# Altium PCB Baseboard-v2.0.PcbDoc (part 4 of 7)
Units mil, origin at the board's own origin, x right, y up, seen from the top; angles counter-clockwise.
Board outline 4488.19 x 3937 mil, 4 copper layers (Top Layer, Ground, Power + Signal, Bottom Layer), stack 61.81 mil thick; 219 components, 194 nets, 891 pads, 449 vias.
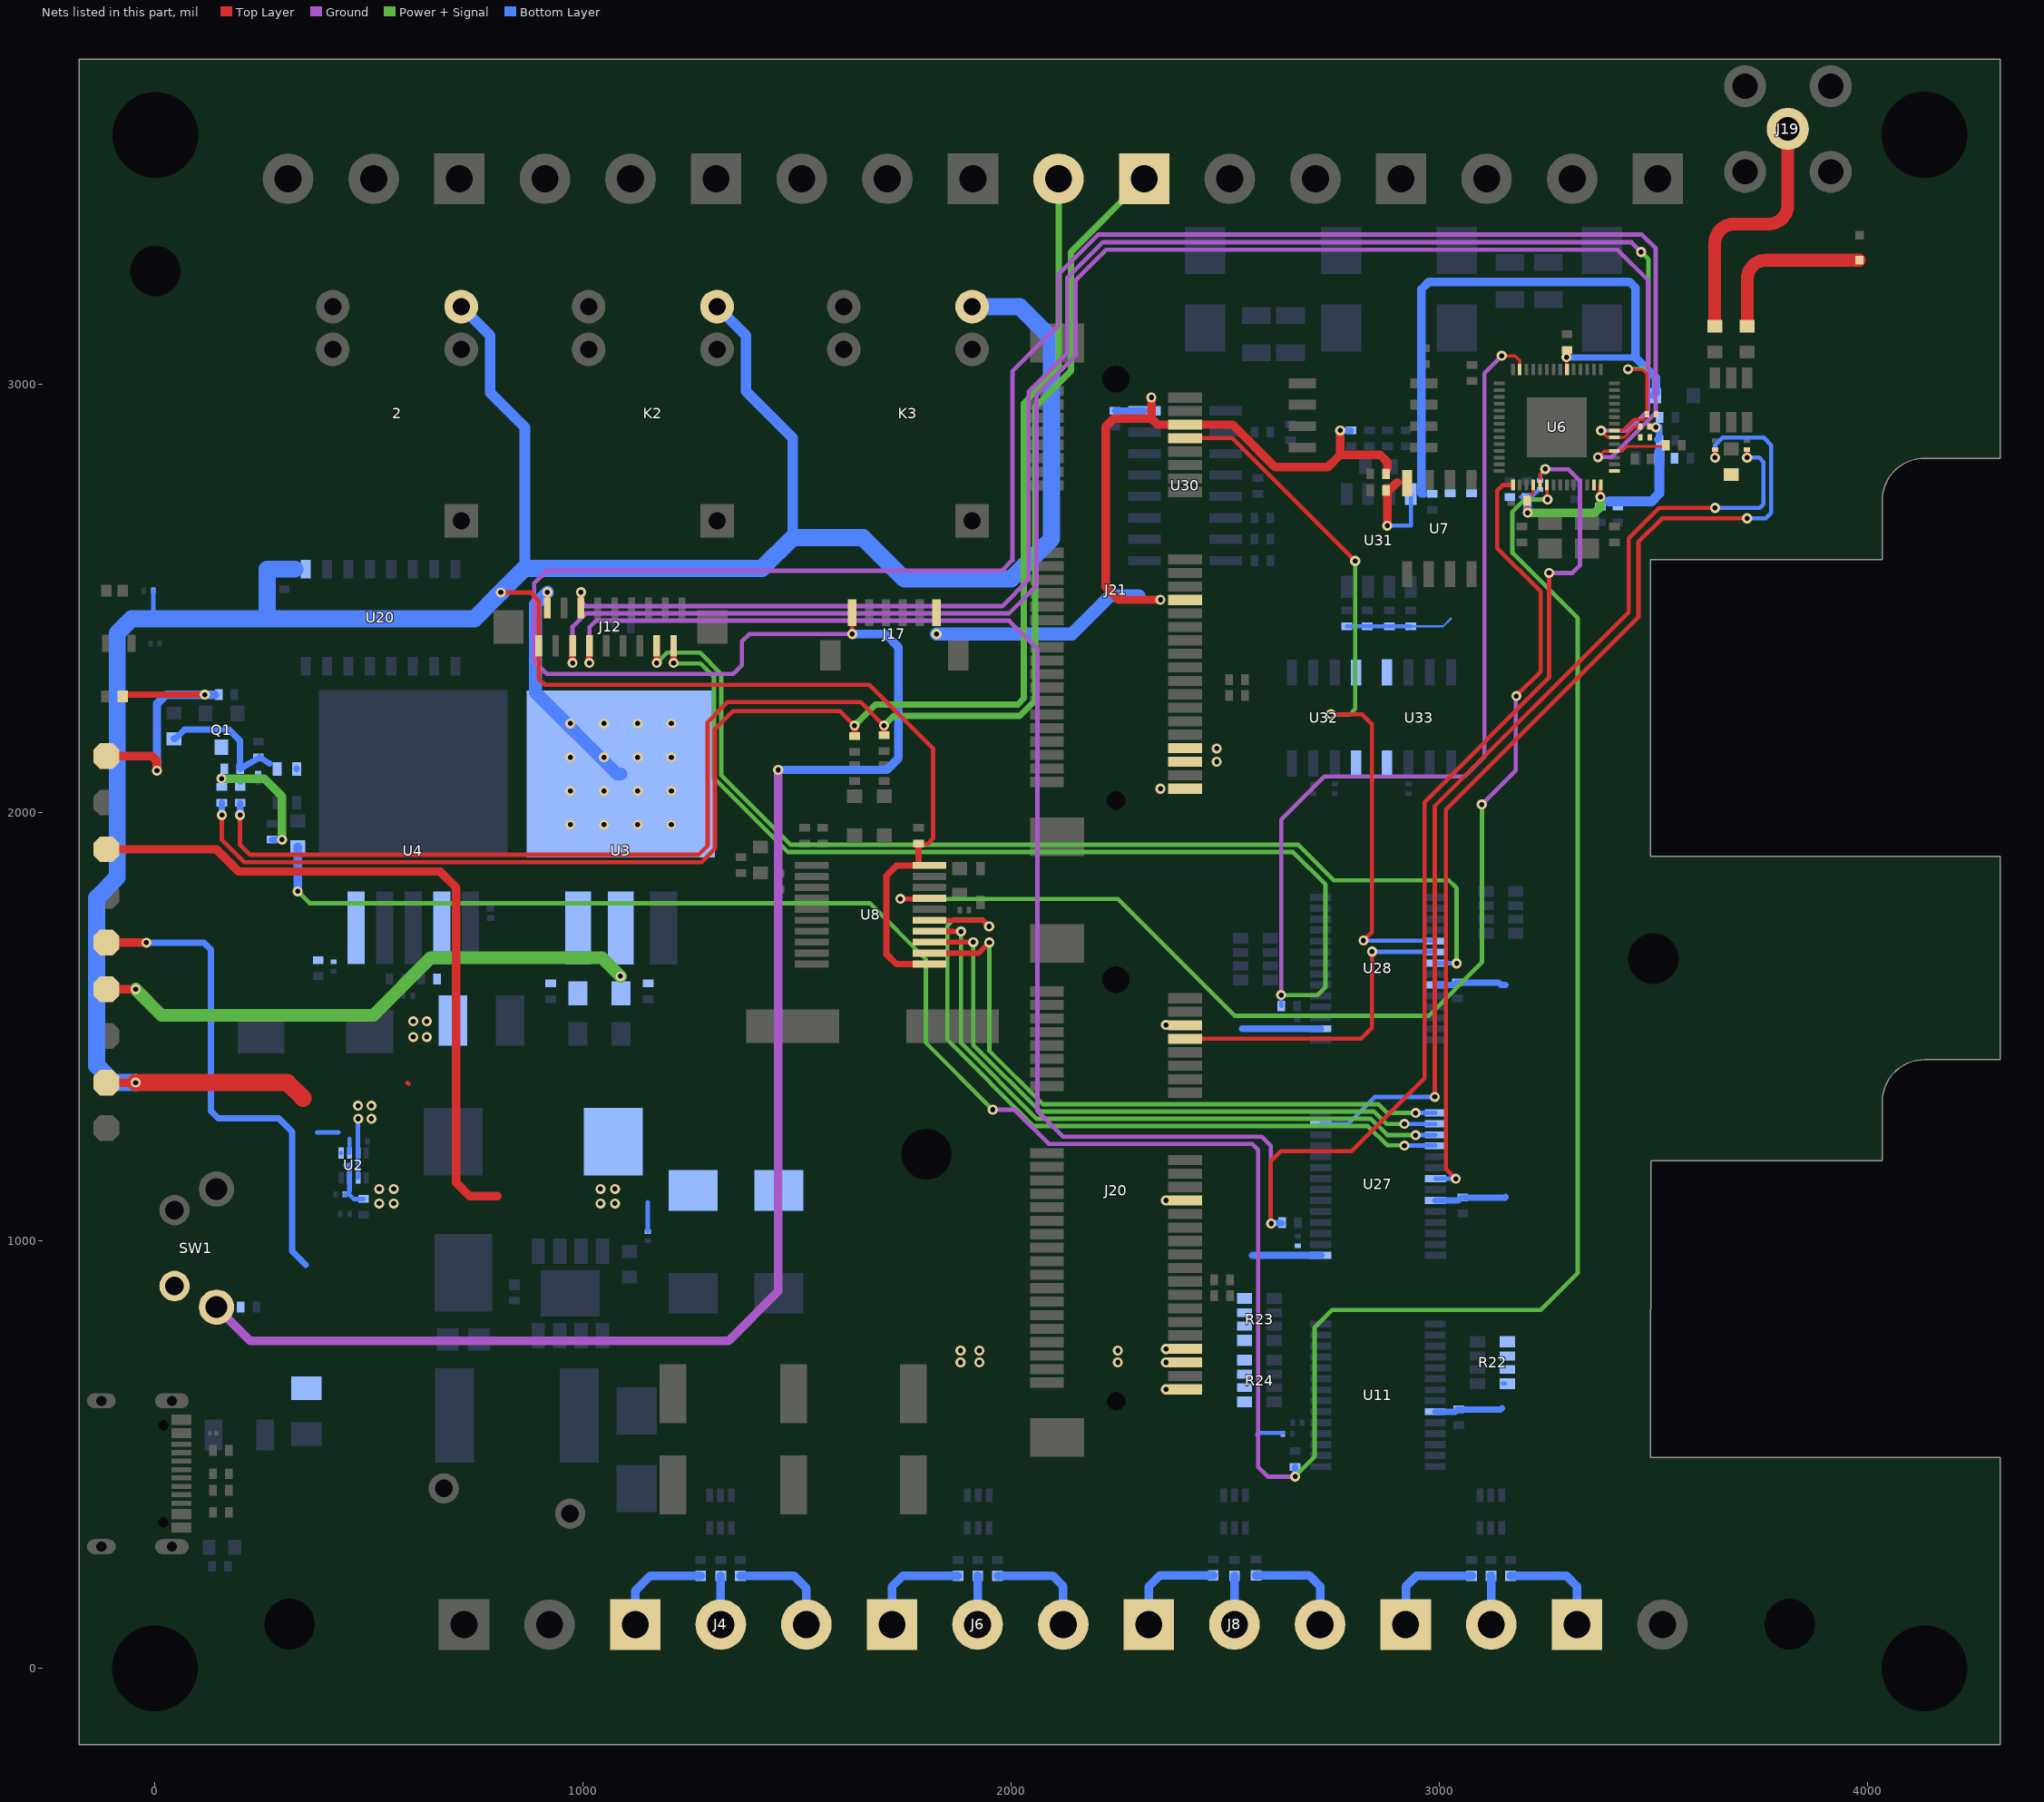
[diagram p4: the nets of this part, all layers, seen from the top]

## Part data (continued)
R22 R23 R24: library part YC164-JR-07100KL, "RES ARRAY 4 RES 100K OHM 1206", LCSC Part Number=C192933, Manufacturer=Yageo, Supplier Part Number=4734737, Category="Resistor Arrays", ComponentLink1Description=https://datasheet.ciiva.com/11807/0900766b80c69e1d-11807026.pdf?src-supplier=Rs, ComponentLink1URL=https://datasheet.ciiva.com/11807/0900766b80c69e1d-11807026.pdf?src-supplier=Rs, ComponentLink2Description=https://datasheet.ciiva.com/8017/443424-8017993.pdf?src-supplier=Element14, ComponentLink2URL=https://datasheet.ciiva.com/8017/443424-8017993.pdf?src-supplier=Element14, ComponentLink3Description=https://datasheet.ciiva.com/8017/443424-8017994.pdf?src-supplier=Element14, ComponentLink3URL=https://datasheet.ciiva.com/8017/443424-8017994.pdf?src-supplier=Element14, ComponentLink4Description=https://datasheet.ciiva.com/17478/pyu-yc-tc164-51-rohs-l-3-17478885.pdf?src-supplier=Future+Electronics, ComponentLink4URL=https://datasheet.ciiva.com/17478/pyu-yc-tc164-51-rohs-l-3-17478885.pdf?src-supplier=Future+Electronics, ComponentLink5Description=https://datasheet.ciiva.com/2693/pyu-yc-tc164-51-rohs-l-3-2693249.pdf?src-supplier=Digi-Key, ComponentLink5URL=https://datasheet.ciiva.com/2693/pyu-yc-tc164-51-rohs-l-3-2693249.pdf?src-supplier=Digi-Key, ComponentLink6Description=https://datasheet.ciiva.com/2693/pyu-yc-tc164-51-rohs-l-3-2693250.pdf?src-supplier=Digi-Key, ComponentLink6URL=https://datasheet.ciiva.com/2693/pyu-yc-tc164-51-rohs-l-3-2693250.pdf?src-supplier=Digi-Key, ComponentLink7Description=https://datasheet.ciiva.com/2693/pyu-yc-tc164-51-rohs-l-3-2693251.pdf?src-supplier=Digi-Key, ComponentLink7URL=https://datasheet.ciiva.com/2693/pyu-yc-tc164-51-rohs-l-3-2693251.pdf?src-supplier=Digi-Key, Item Type=Resistor, Manufacturer Part Number=YC164-JR-07100KL, Pricing="5000=0.0086, 20000=0.0082, 50000=0.0078, 100000=0.0078, 125000=0.0075, 200000=0.0076, 625000=0.0071 (USD)", RoHS=Yes, Stock=10000, Supplier="Future Electronics"
R25 R26 R32 R33: library part RC0402FR-0756KL, "RES 56K OHM 1% 1/16W 0402", Case Code (Imperial)=0402, Case Code (Metric)=1005, LCSC Part Number=C114756, Manufacturer=Yageo, Max Operating Temperature=155°C, Max Power Dissipation=63mW, Min Operating Temperature=-55°C, Package Quantity=1, Power Rating=62.5mW, Resistance Tolerance=1%, Resistor Type="Thick Film", Supplier Part Number 1=3873767, Temperature Coefficient=100ppm/°C, Voltage Rating=50V, Case/Package=0402, Category="Chip SMD Resistors", ComponentLink1Description=https://datasheet.ciiva.com/46412/1018594-46412840.pdf?src-supplier=Element14, ComponentLink1URL=https://datasheet.ciiva.com/46412/1018594-46412840.pdf?src-supplier=Element14, ComponentLink2Description=https://datasheet.ciiva.com/2453/pyu-r-int-thick-7-2453479.pdf?src-supplier=Digi-Key, ComponentLink2URL=https://datasheet.ciiva.com/2453/pyu-r-int-thick-7-2453479.pdf?src-supplier=Digi-Key, ComponentLink3Description=https://datasheet.ciiva.com/2453/pyu-r-int-thick-7-2453480.pdf?src-supplier=Digi-Key, ComponentLink3URL=https://datasheet.ciiva.com/2453/pyu-r-int-thick-7-2453480.pdf?src-supplier=Digi-Key, ComponentLink4Description=https://datasheet.ciiva.com/2453/pyu-r-int-thick-7-2453478.pdf?src-supplier=Digi-Key, ComponentLink4URL=https://datasheet.ciiva.com/2453/pyu-r-int-thick-7-2453478.pdf?src-supplier=Digi-Key, ComponentLink5Description=https://datasheet.ciiva.com/5558/pyu-rc0402-51-rohs-l-6-r-5558279.pdf?src-supplier=Mouser, ComponentLink5URL=https://datasheet.ciiva.com/5558/pyu-rc0402-51-rohs-l-6-r-5558279.pdf?src-supplier=Mouser, ComponentLink6Description=https://datasheet.ciiva.com/7850/1018594-7850045.pdf?src-supplier=Element14, ComponentLink6URL=https://datasheet.ciiva.com/7850/1018594-7850045.pdf?src-supplier=Element14, ComponentLink7Description=https://datasheet.ciiva.com/7850/1018594-7850044.pdf?src-supplier=Element14, ComponentLink7URL=https://datasheet.ciiva.com/7850/1018594-7850044.pdf?src-supplier=Element14, Construction=Rectangular, Depth=0.5mm, Features="Moisture Resistant", Height=0.016inch, Item Type=Resistor, Lead Free="Lead Free", Length=0.039inch, Manufacturer Part Number=RC0402FR-0756KL, Military Standard=Not, Number of Terminations=2, Packaging="Tape and Reel", Pricing 1="10000=0.001, 50000=0.001, 300000=0.0009, 1000000=0.0009, 3000000=0.0008 (USD)", Reach SVHC Compliant=No, RoHS=Yes, RoHS Compliant=Yes, Series=RC, Stock 1=2610000, Supplier 1="Future Electronics", Technology="THICK FILM", Termination=SMD/SMT, Tolerance=1%, Width=0.02inch, Working Voltage=50V
R27: library part RC0603FR-07330KL, "RES 330K OHM 1% 1/10W 0603", Case Code (Imperial)=0603, Case Code (Metric)=1608, LCSC Part Number=C114618, Manufacturer=Yageo, Max Operating Temperature=155°C, Max Power Dissipation=100mW, Min Operating Temperature=-55°C, Resistance Tolerance=1%, Resistor Type="Thick Film", Supplier Part Number 1=9008384, Temperature Coefficient=100ppm/°C, Voltage Rating=75V, Voltage Rating (DC)=50V, Case/Package=0603, Category="Chip SMD Resistors", ComponentLink1Description=https://datasheet.ciiva.com/2455/pyu-r-int-thick-7-2455366.pdf?src-supplier=Digi-Key, ComponentLink1URL=https://datasheet.ciiva.com/2455/pyu-r-int-thick-7-2455366.pdf?src-supplier=Digi-Key, ComponentLink2Description=https://datasheet.ciiva.com/2455/pyu-r-int-thick-7-2455367.pdf?src-supplier=Digi-Key, ComponentLink2URL=https://datasheet.ciiva.com/2455/pyu-r-int-thick-7-2455367.pdf?src-supplier=Digi-Key, ComponentLink3Description=https://datasheet.ciiva.com/2455/pyu-r-int-thick-7-2455365.pdf?src-supplier=Digi-Key, ComponentLink3URL=https://datasheet.ciiva.com/2455/pyu-r-int-thick-7-2455365.pdf?src-supplier=Digi-Key, ComponentLink4Description=https://datasheet.ciiva.com/7746/443971-7746328.pdf?src-supplier=Element14, ComponentLink4URL=https://datasheet.ciiva.com/7746/443971-7746328.pdf?src-supplier=Element14, ComponentLink5Description=https://datasheet.ciiva.com/7746/443971-7746327.pdf?src-supplier=Element14, ComponentLink5URL=https://datasheet.ciiva.com/7746/443971-7746327.pdf?src-supplier=Element14, ComponentLink6Description=https://datasheet.ciiva.com/15189/getdatasheetpartid-323788-15189703.pdf?src-supplier=Verical, ComponentLink6URL=https://datasheet.ciiva.com/15189/getdatasheetpartid-323788-15189703.pdf?src-supplier=Verical, Construction=Rectangular, Depth=0.8mm, Features="Moisture Resistant", Height=0.45mm, Item Type=Resistor, Lead Free="Lead Free", Length=1.6mm, Manufacturer Part Number=RC0603FR-07330KL, Military Standard=Not, Number of Terminations=2, Packaging="Tape and Reel", Pins=2, Power Rating=100mW, Pricing 1="5000=0.0014, 50000=0.0013, 75000=0.0015, 200000=0.0012, 250000=0.0014, 625000=0.0012, 750000=0.0013, 2000000=0.0011, 2500000=0.0012 (USD)", Reach SVHC Compliant=No, RoHS=Yes, RoHS Compliant=Yes, Series=RC, Stock 1=1500000, Supplier 1="Future Electronics", Termination=SMD/SMT, Tolerance=1%, Weight=7.1E-05oz, Width=0.8mm
R28: library part RC0402JR-07150KL, "RES SMD 0402 150kOhm 5% Paper T/R", Case Code (Imperial)=0402, Case Code (Metric)=1005, LCSC Part Number=C137919, Manufacturer=Yageo, Max Operating Temperature=155°C, Max Power Dissipation=63mW, Min Operating Temperature=-55°C, Package Quantity=1, Resistance=150kR, Resistance Tolerance=5%, Resistor Type="Thick Film", Temperature Coefficient=100ppm/°C, Voltage Rating=50V, Case/Package=0402, Category="Chip SMD Resistors", ComponentLink1Description=https://datasheet.ciiva.com/7983/1018594-7983551.pdf?src-supplier=Element14, ComponentLink1URL=https://datasheet.ciiva.com/7983/1018594-7983551.pdf?src-supplier=Element14, ComponentLink2Description=https://datasheet.ciiva.com/2518/pyu-r-int-thick-7-2518929.pdf?src-supplier=Digi-Key, ComponentLink2URL=https://datasheet.ciiva.com/2518/pyu-r-int-thick-7-2518929.pdf?src-supplier=Digi-Key, ComponentLink3Description=https://datasheet.ciiva.com/2518/pyu-r-int-thick-7-2518930.pdf?src-supplier=Digi-Key, ComponentLink3URL=https://datasheet.ciiva.com/2518/pyu-r-int-thick-7-2518930.pdf?src-supplier=Digi-Key, ComponentLink4Description=https://datasheet.ciiva.com/2518/pyu-r-int-thick-7-2518928.pdf?src-supplier=Digi-Key, ComponentLink4URL=https://datasheet.ciiva.com/2518/pyu-r-int-thick-7-2518928.pdf?src-supplier=Digi-Key, ComponentLink5Description=https://datasheet.ciiva.com/7850/1018594-7850149.pdf?src-supplier=Element14, ComponentLink5URL=https://datasheet.ciiva.com/7850/1018594-7850149.pdf?src-supplier=Element14, ComponentLink6Description=https://datasheet.ciiva.com/17072/pyu-rc0402-51-rohs-l-6-r-17072379.pdf?src-supplier=Future+Electronics, ComponentLink6URL=https://datasheet.ciiva.com/17072/pyu-rc0402-51-rohs-l-6-r-17072379.pdf?src-supplier=Future+Electronics, ComponentLink7Description=https://datasheet.ciiva.com/15189/getdatasheetpartid-251830-15189543.pdf?src-supplier=Verical, ComponentLink7URL=https://datasheet.ciiva.com/15189/getdatasheetpartid-251830-15189543.pdf?src-supplier=Verical, Construction=Rectangular, Depth=0.5mm, Features="Moisture Resistant", Height=0.016inch, Item Type=Resistor, Lead Free="Lead Free", Length=1mm, Manufacturer Part Number=RC0402JR-07150KL, Military Standard=Not, Number of Terminations=2, Packaging="Tape and Reel", Power Rating=63mW, Pricing 1="10000=0.00100 (USD)", REACH SVHC="No SVHC", RoHS=Yes, RoHS Compliant=Yes, Series=RC, Size Code=0402, Stock 1=170000, Supplier 1="Arrow Electronics", Supplier Part Number 1=RC0402JR-07150KL, Termination=SMD/SMT, Tolerance=5%, Weight=2.3E-05oz, Width=0.02inch
R31: library part RT0603BRD0768KL, "RES SMD 68K OHM 0.1% 1/10W 0603", Case Code (Imperial)=0603, Case Code (Metric)=1608, Manufacturer=Yageo, Max Operating Temperature=125°C, Min Operating Temperature=-55°C, Power Rating=100mW, Resistance=68kR, Resistor Type="Thin Film", Supplier Part Number 1=YAG4586CT-ND, Temperature Coefficient=25ppm/°C, Tolerance=0.1%, Voltage Rating=75V, Voltage Rating (DC)=50V, Case/Package=0603, Category="Chip SMD Resistors", ComponentLink1Description=https://datasheet.ciiva.com/12694/pyu-rt-1-to-0-05-rohs-l-4-12694907.pdf?src-supplier=Mouser, ComponentLink1URL=https://datasheet.ciiva.com/12694/pyu-rt-1-to-0-05-rohs-l-4-12694907.pdf?src-supplier=Mouser, Construction=Rectangular, Contact Plating=Tin,Matte, Depth=0.8mm, Lead Free="Lead Free", Length=1.6mm, Manufacturer Part Number=RT0603BRD0768KL, Military Standard=Not, Packaging="Tape and Reel", Pricing 1="1=0.34000, 10=0.28800, 100=0.11260, 1000=0.04716, 2500=0.04322 (USD)", Radiation Hardening=No, RoHS=Yes, RoHS Compliant=Yes, Series=RT, Stock 1=45000, Supplier 1=Digi-Key, Termination=SMD/SMT, Width=800um
R73 R74 R75 R76: library part RCS040222R0FKED, "RES SMD 22 OHM 1% 1/5W 0402", Case Code (Imperial)=0402, Case Code (Metric)=1005, LCSC Part Number=C2086081, Manufacturer="Vishay Dale", Max Operating Temperature=155°C, Max Power Dissipation=200mW, Min Operating Temperature=-55°C, Resistor Type="Thick Film", Supplier Part Number 1=541-2880-1-ND, Temperature Coefficient=100ppm/°C, Tolerance=1%, Case/Package=0402, ComponentLink1Description=http://www.vishay.com/docs/20065/rcse3.pdf?src-supplier=Digi-Key, ComponentLink1URL=http://www.vishay.com/docs/20065/rcse3.pdf?src-supplier=Digi-Key, Features="Automotive AEC-Q200", Height=0.016inch, Length=0.039inch, Manufacturer Part Number=RCS040222R0FKED, Number of Terminations=2, Packaging="Tape and Reel", Pricing 1="1=0.12, 10=0.105, 100=0.0402, 1000=0.01771, 2500=0.0153, 5000=0.01368 (USD)", Resistance=22R, RoHS Compliant=Yes, Stock 1=8456, Supplier 1=Digi-Key, Width=0.02inch
R78: library part RC0603FR-07120RL, "RES 120 OHM 1% 1/10W 0603", Case Code (Imperial)=0603, Case Code (Metric)=1608, LCSC Part Number=C114640, Manufacturer=Yageo, Max Operating Temperature=155°C, Max Power Dissipation=100mW, Min Operating Temperature=-55°C, Package Quantity=1, Resistance Tolerance=1%, Resistor Type="Thick Film", Supplier Part Number 1=311-120HRCT-ND, Temperature Coefficient=100ppm/°C, Voltage Rating=50V, Case/Package=0603, Category="Chip SMD Resistors", ComponentLink1Description=https://datasheet.ciiva.com/2553/pyu-r-int-thick-7-2553512.pdf?src-supplier=Digi-Key, ComponentLink1URL=https://datasheet.ciiva.com/2553/pyu-r-int-thick-7-2553512.pdf?src-supplier=Digi-Key, ComponentLink2Description=https://datasheet.ciiva.com/7746/443971-7746248.pdf?src-supplier=Element14, ComponentLink2URL=https://datasheet.ciiva.com/7746/443971-7746248.pdf?src-supplier=Element14, ComponentLink3Description=https://datasheet.ciiva.com/2553/pyu-r-int-thick-7-2553513.pdf?src-supplier=Digi-Key, ComponentLink3URL=https://datasheet.ciiva.com/2553/pyu-r-int-thick-7-2553513.pdf?src-supplier=Digi-Key, ComponentLink4Description=https://datasheet.ciiva.com/7746/443971-7746249.pdf?src-supplier=Element14, ComponentLink4URL=https://datasheet.ciiva.com/7746/443971-7746249.pdf?src-supplier=Element14, ComponentLink5Description=https://datasheet.ciiva.com/2553/pyu-r-int-thick-7-2553514.pdf?src-supplier=Digi-Key, ComponentLink5URL=https://datasheet.ciiva.com/2553/pyu-r-int-thick-7-2553514.pdf?src-supplier=Digi-Key, ComponentLink6Description=https://datasheet.ciiva.com/46395/443971-46395021.pdf?src-supplier=Element14, ComponentLink6URL=https://datasheet.ciiva.com/46395/443971-46395021.pdf?src-supplier=Element14, Construction=Rectangular, Depth=0.8mm, Features="Moisture Resistant", Height=0.022inch, Lead Free="Lead Free", Length=1.6mm, Manufacturer Part Number=RC0603FR-07120RL, Military Standard=Not, Number of Pins=2, Number of Terminations=2, Packaging="Tape and Reel", Power Rating=100mW, Pricing 1="1=0.10000, 10=0.02400, 100=0.00970, 1000=0.00436, 2500=0.00378 (USD)", REACH SVHC="No SVHC", Resistance=120R, RoHS=Yes, RoHS Compliant=Yes, Series=RC, Size Code=0603, Stock 1=839061, Supplier 1=Digi-Key, Termination=SMD/SMT, Tolerance=1%, Voltage Rating (DC)=50V, Width=0.031inch
R87: library part ERA2AEB680X, "RES SMD 68 OHM 0.1% 1/16W 0402", Case Code (Imperial)=0402, Case Code (Metric)=1005, LCSC Part Number=C445573, Manufacturer=Panasonic, Manufacturer Part Number=ERA-2AEB680X, Max Operating Temperature=155°C, Max Power Dissipation=63mW, Min Operating Temperature=-55°C, Package Quantity=10000, Resistor Type="Thin Film,Metal Film", Temperature Coefficient=25ppm/°C, Tolerance=0.1%, Voltage Rating=25V, Case/Package=0402, Category="Chip SMD Resistors", ComponentLink1Description=https://datasheet.ciiva.com/5838/328837-5838032.pdf?src-supplier=Farnell, ComponentLink1URL=https://datasheet.ciiva.com/5838/328837-5838032.pdf?src-supplier=Farnell, ComponentLink2Description=https://datasheet.ciiva.com/11812/0900766b80beefcc-11812130.pdf?src-supplier=RSComponents, ComponentLink2URL=https://datasheet.ciiva.com/11812/0900766b80beefcc-11812130.pdf?src-supplier=RSComponents, ComponentLink3Description=https://datasheet.ciiva.com/7657/328837-7657366.pdf?src-supplier=Element14, ComponentLink3URL=https://datasheet.ciiva.com/7657/328837-7657366.pdf?src-supplier=Element14, ComponentLink4Description=https://datasheet.ciiva.com/7944/328837-7944487.pdf?src-supplier=Element14, ComponentLink4URL=https://datasheet.ciiva.com/7944/328837-7944487.pdf?src-supplier=Element14, ComponentLink5Description=https://datasheet.ciiva.com/17208/aoa0000ce26-17208797.pdf?src-supplier=Avnet+Europe, ComponentLink5URL=https://datasheet.ciiva.com/17208/aoa0000ce26-17208797.pdf?src-supplier=Avnet+Europe, Contact Plating=Tin, Depth=0.5mm, Height=0.35mm, Lead Free="Lead Free", Length=1mm, Military Standard=Not, Mount="Surface Mount", Number of Pins=2, Number of Terminations=2, Packaging="Tape and Reel", Power Rating=63mW, Pricing 1="1=0.36470, 10000=0.05710 (USD)", Radiation Hardening=No, REACH SVHC="No SVHC", Resistance=68R, RoHS=Yes, Stock 1=1, Supplier 1="Arrow Electronics", Supplier Part Number 1=ERA-2AEB680X, Voltage Rating (DC)=25V, Width=0.02inch
R90 R91: library part RC0603FR-07680RL, "RES SMD 680 OHM 1% 1/10W 0603", LCSC Part Number=C112310, Manufacturer=Yageo, Package=0603, ComponentLink4Description=LCSC, ComponentLink4URL=https://www.lcsc.com/product-detail/Chip-Resistor-Surface-Mount_YAGEO-RC0603FR-07680RL_C112310.html, Item Type=Resistor, Manufacturer Part Number=RC0603FR-07680RL
R92: library part RC0402FR-073K3L, "RES 3.3K OHM 1% 1/16W 0402", Case Code (Imperial)=0402, Case Code (Metric)=1005, LCSC Part Number=C137992, Manufacturer=Yageo, Max Operating Temperature=155°C, Max Power Dissipation=63mW, Min Operating Temperature=-55°C, Package Quantity=1, Power Rating=62.5mW, Resistance=3.3kR, Resistance Tolerance=1%, Resistor Type="Thick Film", Supplier Part Number 1=603-RC0402FR-073K3L, Temperature Coefficient=100ppm/°C, Voltage Rating=50V, Case/Package=0402, Category="Chip SMD Resistors", ComponentLink1Description=https://datasheet.ciiva.com/11808/0900766b80c66297-11808441.pdf?src-supplier=RSComponents, ComponentLink1URL=https://datasheet.ciiva.com/11808/0900766b80c66297-11808441.pdf?src-supplier=RSComponents, ComponentLink2Description=https://datasheet.ciiva.com/46394/1018594-46394940.pdf?src-supplier=Element14, ComponentLink2URL=https://datasheet.ciiva.com/46394/1018594-46394940.pdf?src-supplier=Element14, ComponentLink3Description=https://datasheet.ciiva.com/2453/pyu-r-int-thick-7-2453395.pdf?src-supplier=Digi-Key, ComponentLink3URL=https://datasheet.ciiva.com/2453/pyu-r-int-thick-7-2453395.pdf?src-supplier=Digi-Key, ComponentLink4Description=https://datasheet.ciiva.com/2453/pyu-r-int-thick-7-2453396.pdf?src-supplier=Digi-Key, ComponentLink4URL=https://datasheet.ciiva.com/2453/pyu-r-int-thick-7-2453396.pdf?src-supplier=Digi-Key, ComponentLink5Description=https://datasheet.ciiva.com/2453/pyu-r-int-thick-7-2453394.pdf?src-supplier=Digi-Key, ComponentLink5URL=https://datasheet.ciiva.com/2453/pyu-r-int-thick-7-2453394.pdf?src-supplier=Digi-Key, ComponentLink6Description=https://datasheet.ciiva.com/16746/pyu-rc0402-51-rohs-l-6-r-16746361.pdf?src-supplier=Future+Electronics, ComponentLink6URL=https://datasheet.ciiva.com/16746/pyu-rc0402-51-rohs-l-6-r-16746361.pdf?src-supplier=Future+Electronics, Construction=Rectangular, Depth=0.5mm, Features="Moisture Resistant", Height=0.016inch, Item Type=Resistor, Lead Free="Lead Free", Length=1mm, Manufacturer Part Number=RC0402FR-073K3L, Military Standard=Not, Number of Pins=2, Number of Terminations=2, Packaging="Tape and Reel", Pricing 1="1=0.10000, 10=0.01400, 50=0.01400, 100=0.00600, 1000=0.00300, 5000=0.00200, 10000=0.00100 (USD)", REACH SVHC="No SVHC", RoHS=Yes, RoHS Compliant=Yes, Series=RC, Size Code=0402, Stock 1=2413047, Supplier 1=Mouser, Technology="THICK FILM", Termination=SMD/SMT, Tolerance=1%, Voltage Rating (DC)=50V, Width=0.5mm
RN1 RN2: library part YC164-FR-0710KL, "RES ARRAY 4 RES 10K OHM 1206", Case Code (Imperial)=1206, Case Code (Metric)=3216, LCSC Part Number=C110924, Manufacturer=Yageo, Max Operating Temperature=155°C, Min Operating Temperature=-55°C, Number of Resistors=4, Power Per Element=62.5mW, Resistance Tolerance=1%, Supplier Part Number 1=5054288, Temperature Coefficient=200ppm/°C, Voltage Rating=50V, Category="Resistor Arrays", Circuit Type=Isolated, ComponentLink1Description=http://www.farnell.com/datasheets/2167431.pdf?src-supplier=Farnell, ComponentLink1URL=http://www.farnell.com/datasheets/2167431.pdf?src-supplier=Farnell, ComponentLink2Description=https://media.digikey.com/pdf/Data%20Sheets/Yageo%20PDFs/YC102-358,TC122-164_Series_DS.pdf?src-supplier=Digi-Key, ComponentLink2URL=https://media.digikey.com/pdf/Data%20Sheets/Yageo%20PDFs/YC102-358,TC122-164_Series_DS.pdf?src-supplier=Digi-Key, ComponentLink3Description=http://www.farnell.com/datasheets/2167431.pdf?src-supplier=Element14, ComponentLink3URL=http://www.farnell.com/datasheets/2167431.pdf?src-supplier=Element14, ComponentLink4Description=http://www.farnell.com/datasheets/443424.pdf?src-supplier=Element14, ComponentLink4URL=http://www.farnell.com/datasheets/443424.pdf?src-supplier=Element14, ComponentLink5Description=http://www.farnell.com/datasheets/2167431.pdf?src-supplier=Newark, ComponentLink5URL=http://www.farnell.com/datasheets/2167431.pdf?src-supplier=Newark, Height=0.028inch, Item Type="Resistor Array", Lead Free="Lead Free", Length=0.126inch, Manufacturer Part Number=YC164-FR-0710KL, Mounting Technology="Surface Mount", Number of Circuits=4, Number of Elements=4, Packaging="Tape and Reel", Pins=8, Pricing 1="5000=0.0101, 20000=0.0095, 50000=0.0092, 125000=0.0089, 200000=0.0085 (USD)", Reach SVHC Compliant=Unknown, RoHS=Yes, RoHS Compliant=Yes, Series=YC164, Stock 1=25000, Supplier 1="Future Electronics", Tolerance=1%, Width=0.063inch
SB1 SB2 SB3: "Solder Bridge ON", Item Type="Solder Bridge", Manufacturer Part Number="Solder Bridge 0402"
SW1: "50mA Lying SPST 24V Plugin Tactile Switches ROHS", Manufacturer="TE Connectivity", Category="Pushbutton Switches", ComponentLink1Description=https://datasheet.ciiva.com/30072/eng-cd-1825027-f-30072833.pdf?src-supplier=Onlinecomponents.com, ComponentLink1URL=https://datasheet.ciiva.com/30072/eng-cd-1825027-f-30072833.pdf?src-supplier=Onlinecomponents.com, ComponentLink2Description=https://datasheet.ciiva.com/16393/1825027-8-16393346.pdf?src-supplier=Future+Electronics, ComponentLink2URL=https://datasheet.ciiva.com/16393/1825027-8-16393346.pdf?src-supplier=Future+Electronics, ComponentLink3Description=https://datasheet.ciiva.com/8164/eng-cd-1825027-g4-8164921.pdf?src-supplier=Avnet, ComponentLink3URL=https://datasheet.ciiva.com/8164/eng-cd-1825027-g4-8164921.pdf?src-supplier=Avnet, Item Type="Tactile Switch", Manufacturer Part Number=1825027-8, Pricing 1="1=0.13800, 10=0.13370, 25=0.12590, 100=0.10940, 250=0.10570, 500=0.09520, 1000=0.07320, 2500=0.07250, 5000=0.06250 (USD)", RoHS=Yes, Stock 1=178529, Supplier 1="Arrow Electronics", Supplier Part Number 1=1825027-8
U1: "IC REG BUCK ADJUSTABLE 5A 8SOPWR", Case/Package=HSOP, LCSC Part Number=C114425, Manufacturer="Texas Instruments", Max Operating Temperature=125°C, Max Output current=5A, Max Output Voltage=31V, Max Supply Voltage=36V, Min Input Voltage=5.5V, Min Operating Temperature=-40°C, Min Output Voltage=1.22V, Package Quantity=1, Quiescent Current=3mA, Supplier Part Number 1=595-TPS5450DDAR, Switching Frequency=500kHz, Category="Voltage Regulators - Switching", ComponentLink1Description=https://datasheet.ciiva.com/15113/getdatasheetpartid-172659-15113657.pdf?src-supplier=Verical, ComponentLink1URL=https://datasheet.ciiva.com/15113/getdatasheetpartid-172659-15113657.pdf?src-supplier=Verical, ComponentLink2Description=https://datasheet.ciiva.com/2035/tps5450-2035367.pdf?src-supplier=Digi-Key, ComponentLink2URL=https://datasheet.ciiva.com/2035/tps5450-2035367.pdf?src-supplier=Digi-Key, ComponentLink3Description=https://datasheet.ciiva.com/2035/tps5450-2035366.pdf?src-supplier=Digi-Key, ComponentLink3URL=https://datasheet.ciiva.com/2035/tps5450-2035366.pdf?src-supplier=Digi-Key, ComponentLink4Description=https://datasheet.ciiva.com/2035/tps5450-2035368.pdf?src-supplier=Digi-Key, ComponentLink4URL=https://datasheet.ciiva.com/2035/tps5450-2035368.pdf?src-supplier=Digi-Key, ComponentLink5Description=https://datasheet.ciiva.com/14303/tps5450-14303689.pdf?src-supplier=Avnet, ComponentLink5URL=https://datasheet.ciiva.com/14303/tps5450-14303689.pdf?src-supplier=Avnet, ComponentLink6Description=https://datasheet.ciiva.com/3220/tps5450-3220230.pdf?src-supplier=Avnet, ComponentLink6URL=https://datasheet.ciiva.com/3220/tps5450-3220230.pdf?src-supplier=Avnet, Efficiency=90%, Height=1.55mm, Item Type=IC, Lead Free="Lead Free", Length=5mm, Manufacturer Part Number=TPS5450DDAR, Mounting Technology="Surface Mount", Number of Outputs=1, Operating Supply Voltage=36V, Output Current=5A, Output Type=Adjustable, Output Voltage=31V, Packaging="Tape and Reel", Pins=8, Pricing 1="1=5.44, 10=4.88, 50=4.62, 100=4, 1000=2.9, 10000=2.8 (USD)", Radiation Hardening=No, RoHS=Yes, RoHS Compliant=Yes, Series=SWIFT™, Stock 1=10304, Supplier 1=Mouser, Synchronous Rectifier=No, Weight=0.00249oz, Width=4mm
U2: "1.6-V TO 5.5-V, 40-M, 2.5-A, LOW", LCSC Part Number=C3235557, Manufacturer="Texas Instruments", Supplier Part Number 1=595-TPS2116DRLR, Category="Voltage Supervisors", ComponentLink1Description=LCSC, ComponentLink1URL=https://www.lcsc.com/product-detail/Power-Distribution-Switches_Texas-Instruments-TPS2116DRLR_C3235557.html, Item Type=IC, Manufacturer Part Number=TPS2116DRLR, Pricing 1="1=0.9, 10=0.814, 50=0.772, 100=0.634, 1000=0.414, 10000=0.363 (USD)", RoHS=Yes, Stock 1=27931, Supplier 1=Mouser
U3: "72dB@(120Hz) 5A Fixed 3.3V~3.3V Positive 12V TO-263-3 Linear Voltage Regulators (LDO) ROHS", LCSC Part Number=C259972, Manufacturer=HGSEMI, Package=TO-263-3, ComponentLink1Description=LCSC, ComponentLink1URL=https://www.lcsc.com/product-detail/Linear-Voltage-Regulators-LDO_HGSEMI-LM1084S-3-3-TR_C259972.html, Item Type=IC, Manufacturer Part Number=LM1084S-3.3/TR
U4: "IC REG LDO ADJ 3A TO263-5", Case/Package=TO-263, Dropout Voltage=370mV, Input Bias Current=40nA, LCSC Part Number=C11149, Manufacturer=Microchip, Max Input Voltage=26V, Max Operating Temperature=125°C, Max Output current=3A, Max Output Voltage=25V, Min Input Voltage=2.5V, Min Operating Temperature=-40°C, Min Output Voltage=1.25V, Package Quantity=750, Quiescent Current=35mA, Reference Voltage=1.24V, Supplier Part Number 1=3153683, Accuracy=1%, Category="Voltage Regulators - Linear", ComponentLink1Description=https://datasheet.ciiva.com/23772/1572633-23772885.pdf?src-supplier=Newark, ComponentLink1URL=https://datasheet.ciiva.com/23772/1572633-23772885.pdf?src-supplier=Newark, ComponentLink2Description=https://datasheet.ciiva.com/16296/mic29150-16296190.pdf?src-supplier=Future+Electronics, ComponentLink2URL=https://datasheet.ciiva.com/16296/mic29150-16296190.pdf?src-supplier=Future+Electronics, ComponentLink3Description=https://datasheet.ciiva.com/15200/getdatasheetpartid-143209-15200663.pdf?src-supplier=Verical, ComponentLink3URL=https://datasheet.ciiva.com/15200/getdatasheetpartid-143209-15200663.pdf?src-supplier=Verical, Height=4.59mm, Item Type=IC, Lead Free="Lead Free", Length=10.67mm, Manufacturer Part Number=MIC29302WU-TR, Mount="Surface Mount", Number of Outputs=1, Number of Pins=5, Number of Regulators=1, Output Configuration=Positive, Output Current=3A, Output Type=Adjustable, Output Voltage=26V, Packaging="Tape and Reel", Polarity=Positive, Pricing 1="750=2.12000, 1500=2.09000, 2250=2.07000, 3000=2.06000, 3750=2.02000 (USD)", Radiation Hardening=No, Reach SVHC Compliant=Yes, RoHS=Yes, RoHS Compliant=Yes, Series=-, Supplier 1="Future Electronics", Width=9.17mm
U5: "IC FLASH 64M SPI 133MHZ 8SOIC", Case/Package=SOIC, LCSC Part Number=C179171, Manufacturer=Winbond, Max Operating Temperature=85°C, Min Operating Temperature=-40°C, Category=Memory, ComponentLink1Description=http://www.winbond.com/resource-files/w25q64jv%20spi%20%20%20revc%2006032016%20kms.pdf?src-supplier=Digi-Key, ComponentLink1URL=http://www.winbond.com/resource-files/w25q64jv%20spi%20%20%20revc%2006032016%20kms.pdf?src-supplier=Digi-Key, ComponentLink2Description=http://www.winbond.com/resource-files/w25q64jv%20revj%2003272018%20plus.pdf?src-supplier=Digi-Key, ComponentLink2URL=http://www.winbond.com/resource-files/w25q64jv%20revj%2003272018%20plus.pdf?src-supplier=Digi-Key, Interface=SPI,Serial, Item Type=IC, Manufacturer Part Number="W25Q64JVSSIQ TR", Memory Format=FLASH,NOR, Packaging="Tape and Reel", Pricing 1="2000=0.8199, 4000=0.7715, 6000=0.7637, 10000=0.7635 (USD)", RoHS=Yes, Series=SpiFlash®, Stock 1=56000, Supplier 1="Arrow Electronics", Supplier Part Number 1="W25Q64JVSSIQ TR"
U6: "SMD IC ESP32-S3R8, DUAL-CORE MCU", Manufacturer="Espressif Systems", Supplier Part Number 1=356-ESP32-S3R8, Category="RF Receivers, Transceivers", Item Type=IC, Manufacturer Part Number=ESP32-S3R8, Pricing 1="1=2.46, 10=2.46, 50=2.46, 100=2.46, 1000=2.46, 10000=2.46 (USD)", RoHS=No, Stock 1=2366, Supplier 1=Mouser
U7: "IC AUTHENTICATION CHIP 8SOIC", LCSC Part Number=C5444784, Manufacturer=Microchip, Supplier Part Number 1=2368834P, Category="Interface ICs", ComponentLink1Description=LCSC, ComponentLink1URL=https://www.lcsc.com/product-detail/Security-Verification-Encryption-ICs_Microchip-Tech-ATECC608B-SSHDA-B_C5444784.html, Item Type=IC, Manufacturer Part Number=ATECC608B-SSHDA-B, Pricing 1="20=0.758, 50=0.704, 80=0.691 (GBP)", RoHS=Yes, Stock 1=590, Supplier 1=Rs
U8: "IC TELECOM INTERFACE 20SSOP", Case/Package=SSOP, Frequency=3.58MHz, LCSC Part Number=C1522106, Manufacturer=Microsemi, Max Operating Temperature=85°C, Max Power Dissipation=500mW, Max Supply Voltage=5.25V, Min Operating Temperature=-40°C, Min Supply Voltage=4.75V, Operating Supply Current=3mA, Operating Supply Voltage=5V, Package Quantity=660, Supplier Part Number 1=03AH2719, Category=Uncategorized, ComponentLink1Description=https://datasheet.ciiva.com/29641/mt8870d-datasheet-oct2006-29641321.pdf?src-supplier=Digi-Key, ComponentLink1URL=https://datasheet.ciiva.com/29641/mt8870d-datasheet-oct2006-29641321.pdf?src-supplier=Digi-Key, Item Type=IC, Logic Function=Receiver, Manufacturer Part Number=MT8870DN1, Mounting Technology="Surface Mount", Number of Circuits=1, Packaging=Rail/Tube, Pins=20, Radiation Hardening=No, RoHS=No, RoHS Compliant=No, Supplier 1=Newark, Weight=0.016oz
U9: "IC RF SWITCH SPDT 3GHZ SOT23-6", Case/Package=SOT-23-6, Clock Frequency=3GHz, Manufacturer="Analog Devices", Max Operating Temperature=85°C, Max Power Dissipation=360mW, Min Operating Temperature=-40°C, Operating Frequency="DC to 3 GHz", Operating Supply Voltage=8V, Package Quantity=500, Supplier Part Number 1=505-HMC221BETRCT-ND, Category="RF Semiconductors and Devices", ComponentLink1Description=https://datasheet.ciiva.com/29636/hmc221b-29636048.pdf?src-supplier=Digi-Key, ComponentLink1URL=https://datasheet.ciiva.com/29636/hmc221b-29636048.pdf?src-supplier=Digi-Key, ComponentLink2Description=https://datasheet.ciiva.com/29636/qtr-2013-00285-29636046.pdf?src-supplier=Digi-Key, ComponentLink2URL=https://datasheet.ciiva.com/29636/qtr-2013-00285-29636046.pdf?src-supplier=Digi-Key, ComponentLink3Description=https://datasheet.ciiva.com/29636/qtr-2013-00285-29636047.pdf?src-supplier=Digi-Key, ComponentLink3URL=https://datasheet.ciiva.com/29636/qtr-2013-00285-29636047.pdf?src-supplier=Digi-Key, IIP3=54dBm, Impedance=50R, Insertion Loss=0.8dB, Item Type=IC, Manufacturer Part Number=HMC221BETR, Number of Switches=1, P1dB=29dBm, Packaging="Tape and Reel", Pricing 1="1=3.54, 10=3.183, 25=3.0092, 100=2.6081, 250=2.47436 (USD)", RoHS=No, Series=-, Stock 1=2378, Supplier 1=Digi-Key, Technology=GAAS, Test Frequency=3GHz, Throw Configuration=SPDT
U11 U27 U28: "IC XPNDR 1.7MHZ I2C 28SSOP", Case/Package=SSOP, Clock Frequency=10MHz, Frequency=1.7MHz, LCSC Part Number=C558584, Manufacturer=Microchip, Max Operating Temperature=125°C, Min Operating Temperature=-40°C, Nominal Supply Voltage=5.5V, Output Current=25mA, Package Quantity=2100, Power Dissipation=700mW, Supplier Part Number 1=MCP23017T-E/SSCT-ND, Supply Current=1mA, Category="Interface ICs", ComponentLink1Description=https://datasheet.ciiva.com/12267/21952b-12267583.pdf?src-supplier=Mouser, ComponentLink1URL=https://datasheet.ciiva.com/12267/21952b-12267583.pdf?src-supplier=Mouser, ComponentLink2Description=https://datasheet.ciiva.com/8128/21952b-8128586.pdf?src-supplier=Avnet, ComponentLink2URL=https://datasheet.ciiva.com/8128/21952b-8128586.pdf?src-supplier=Avnet, ComponentLink3Description=https://datasheet.ciiva.com/16454/filehandler-aspxddocname-en023709-16454267.pdf?src-supplier=Future+Electronics, ComponentLink3URL=https://datasheet.ciiva.com/16454/filehandler-aspxddocname-en023709-16454267.pdf?src-supplier=Future+Electronics, ComponentLink4Description=https://datasheet.ciiva.com/1780/21952b-1780738.pdf?src-supplier=Digi-Key, ComponentLink4URL=https://datasheet.ciiva.com/1780/21952b-1780738.pdf?src-supplier=Digi-Key, Interface=I2C,Serial, Item Type=IC, Lead Free="Lead Free", Manufacturer Part Number=MCP23017T-E/SS, Mounting Technology="Surface Mount", Number of Bits=16, Number of Channels=1, Number of I/Os=16, Operating Supply Voltage=5.5V, Output Type=PUSH-PULL, Packaging="Tape and Reel", Pins=28, Pricing 1="1=1.69, 25=1.4, 100=1.28 (USD)", RoHS=Yes, RoHS Compliant=Yes, Series=-, Stock 1=26314, Supplier 1=Digi-Key
U20: "100uA@50V 3V@2V,300mA 1.6V@350mA 4mA@12V 100uA@50V 1.25V@350mA 500mA 25pF SOP-16_150mil Darlington Transistor Arrays ROHS", LCSC Part Number=C181730, Manufacturer=Mixic, Package=SOP-16_150mil, ComponentLink1Description=LCSC, ComponentLink1URL=https://www.lcsc.com/product-detail/Darlington-Transistor-Arrays_Mixic-ULN2003A_C181730.html, Item Type=IC, Manufacturer Part Number=ULN2003A
U30: "IC TRANSCEIVER FULL 2/2 16SOIC", Case/Package=D, LCSC Part Number=C18261, Manufacturer="Texas Instruments", Max Operating Temperature=85°C, Max Supply Voltage=5.5V, Min Operating Temperature=-40°C, Min Supply Voltage=3V, Operating Supply Current=1mA, Operating Supply Voltage=5V, Package Quantity=1, Supplier Part Number 1=595-MAX3232IDR, Category="Interface ICs", ComponentLink1Description=https://datasheet.ciiva.com/8064/1882754-8064745.pdf?src-supplier=Element14, ComponentLink1URL=https://datasheet.ciiva.com/8064/1882754-8064745.pdf?src-supplier=Element14, ComponentLink2Description=https://datasheet.ciiva.com/46394/1882754-46394523.pdf?src-supplier=Element14, ComponentLink2URL=https://datasheet.ciiva.com/46394/1882754-46394523.pdf?src-supplier=Element14, ComponentLink3Description=https://datasheet.ciiva.com/46397/1882754-46397996.pdf?src-supplier=Element14, ComponentLink3URL=https://datasheet.ciiva.com/46397/1882754-46397996.pdf?src-supplier=Element14, ComponentLink4Description=https://datasheet.ciiva.com/1701/max3232-1701626.pdf?src-supplier=Digi-Key, ComponentLink4URL=https://datasheet.ciiva.com/1701/max3232-1701626.pdf?src-supplier=Digi-Key, ComponentLink5Description=https://datasheet.ciiva.com/1701/max3232-1701625.pdf?src-supplier=Digi-Key, ComponentLink5URL=https://datasheet.ciiva.com/1701/max3232-1701625.pdf?src-supplier=Digi-Key, ComponentLink6Description=https://datasheet.ciiva.com/1701/max3232-1701627.pdf?src-supplier=Digi-Key, ComponentLink6URL=https://datasheet.ciiva.com/1701/max3232-1701627.pdf?src-supplier=Digi-Key, Data Rate=250Kbps, Item Type=IC, Lead Free="Lead Free", Logic Function=Transceiver,Receiver, Manufacturer Part Number=MAX3232IDR, Mounting Technology="Surface Mount", Number of Drivers=2, Number of Receivers=2, Number of Transceivers=1, Number of Transmitters=2, Packaging="Tape and Reel", Pins=16, Pricing 1="1=2.37, 10=2.37, 50=2.37, 100=2.37, 1000=2.37, 10000=2.37 (USD)", Reach SVHC Compliant=No, Receiver Hysteresis=300mV, RoHS=Yes, RoHS Compliant=Yes, Series=-, Simplex/Duplex="Full Duplex", Stock 1=22181, Supplier 1=Mouser, Supply Current=1mA, Weight=0.004998oz
U31: "SOP-8 RS-485/RS-422 ICs ROHS", LCSC Part Number=C519086, Manufacturer=HGSEMI, Package=SOP-8, ComponentLink1Description=LCSC, ComponentLink1URL=https://www.lcsc.com/product-detail/RS-485-RS-422-ICs_HGSEMI-SP3485EIM-TR_C519086.html, Item Type=IC, Manufacturer Part Number=SP3485EIM/TR
U32: "DGTL ISO 2.5KV GEN PURP 8SOIC", Case/Package=R, Isolated Power=No, LCSC Part Number=C9669, Manufacturer="Analog Devices", Max Operating Temperature=125°C, Max Supply Current=600uA, Max Supply Voltage=5.5V, Min Operating Temperature=-40°C, Min Supply Voltage=2.7V, Output Current=35mA, Voltage=5V, Approvals=UL,CSA,VDE, Category="Interface ICs", Channel Type=Unidirectional, ComponentLink1Description=https://datasheet.ciiva.com/15119/getdatasheetpartid-121048-15119389.pdf?src-supplier=Verical, ComponentLink1URL=https://datasheet.ciiva.com/15119/getdatasheetpartid-121048-15119389.pdf?src-supplier=Verical, ComponentLink2Description=https://datasheet.ciiva.com/15367/adum1200-1201-279454-15367752.pdf?src-supplier=Mouser, ComponentLink2URL=https://datasheet.ciiva.com/15367/adum1200-1201-279454-15367752.pdf?src-supplier=Mouser, ComponentLink3Description=https://datasheet.ciiva.com/3149/adum1200-1201-3149740.pdf?src-supplier=Avnet, ComponentLink3URL=https://datasheet.ciiva.com/3149/adum1200-1201-3149740.pdf?src-supplier=Avnet, ComponentLink4Description=https://datasheet.ciiva.com/3148/adum1200-1201-3148345.pdf?src-supplier=Avnet, ComponentLink4URL=https://datasheet.ciiva.com/3148/adum1200-1201-3148345.pdf?src-supplier=Avnet, ComponentLink5Description=https://datasheet.ciiva.com/2081/adum1200-1201-2081793.pdf?src-supplier=Digi-Key, ComponentLink5URL=https://datasheet.ciiva.com/2081/adum1200-1201-2081793.pdf?src-supplier=Digi-Key, ComponentLink6Description=https://datasheet.ciiva.com/2081/adum1200-1201-2081794.pdf?src-supplier=Digi-Key, ComponentLink6URL=https://datasheet.ciiva.com/2081/adum1200-1201-2081794.pdf?src-supplier=Digi-Key, ComponentLink7Description=https://datasheet.ciiva.com/2081/adum1200-1201-2081792.pdf?src-supplier=Digi-Key, ComponentLink7URL=https://datasheet.ciiva.com/2081/adum1200-1201-2081792.pdf?src-supplier=Digi-Key, Data Rate=25Mbps, ESD Protection=No, Item Type=IC, Lead Free="Contains Lead", Manufacturer Part Number=ADUM1201ARZ-RL7, Number of Channels=2, Operating Supply Current=600uA, Packaging="Tape and Reel", Pins=8, Polarity=Bidirectional, Pricing 1="1=3.9521, 10=3.5429, 25=3.3533, 100=2.9042, 250=2.7545, 500=2.475, 1000=2.2037 (USD)", Propagation Delay=150ns, Pulse Width Distortion (PWD)=40ns, Radiation Hardening=No, RoHS=Yes, RoHS Compliant=Yes, Series=iCoupler®, Stock 1=710, Supplier 1="Arrow Electronics", Supplier Part Number 1=ADUM1201ARZ-RL7, Turn-On Delay Time=150ns, Type="General Purpose", Weight=0.019048oz
U33: "DGTL ISO 2.5KV GEN PURP 8SOIC", Case/Package=R, Isolated Power=No, LCSC Part Number=C15219, Manufacturer="Analog Devices", Max Operating Temperature=125°C, Max Supply Voltage=5.5V, Min Operating Temperature=-40°C, Min Supply Voltage=2.7V, Operating Supply Voltage=3.3V, Output Current=35mA, Package Quantity=1000, Supply Current=600uA, Category="Interface ICs", Channel Type=Unidirectional, ComponentLink1Description=https://datasheet.ciiva.com/15119/getdatasheetpartid-258305-15119482.pdf?src-supplier=Verical, ComponentLink1URL=https://datasheet.ciiva.com/15119/getdatasheetpartid-258305-15119482.pdf?src-supplier=Verical, ComponentLink2Description=https://datasheet.ciiva.com/30514/1805054-30514023.pdf?src-supplier=Jameco, ComponentLink2URL=https://datasheet.ciiva.com/30514/1805054-30514023.pdf?src-supplier=Jameco, ComponentLink3Description=https://datasheet.ciiva.com/3148/adum1200-1201-3148342.pdf?src-supplier=Avnet, ComponentLink3URL=https://datasheet.ciiva.com/3148/adum1200-1201-3148342.pdf?src-supplier=Avnet, ComponentLink4Description=https://datasheet.ciiva.com/2081/adum1200-1201-2081796.pdf?src-supplier=Digi-Key, ComponentLink4URL=https://datasheet.ciiva.com/2081/adum1200-1201-2081796.pdf?src-supplier=Digi-Key, ComponentLink5Description=https://datasheet.ciiva.com/2081/adum1200-1201-2081797.pdf?src-supplier=Digi-Key, ComponentLink5URL=https://datasheet.ciiva.com/2081/adum1200-1201-2081797.pdf?src-supplier=Digi-Key, ComponentLink6Description=https://datasheet.ciiva.com/2081/adum1200-1201-2081795.pdf?src-supplier=Digi-Key, ComponentLink6URL=https://datasheet.ciiva.com/2081/adum1200-1201-2081795.pdf?src-supplier=Digi-Key, Data Rate=25Mbps, Item Type=IC, Lead Free="Contains Lead", Manufacturer Part Number=ADUM1200ARZ-RL7, Number of Channels=2, Packaging="Tape and Reel", Pins=8, Pricing 1="1=3.887, 10=3.493, 25=3.295, 100=2.865, 250=2.706, 500=2.425, 1000=2.066, 3000=2.048, 6000=2.025 (USD)", Propagation Delay=150ns, Pulse Width Distortion (PWD)=40ns, Radiation Hardening=No, RoHS=Yes, RoHS Compliant=Yes, Series=iCoupler®, Stock 1=14777, Supplier 1="Arrow Electronics", Supplier Part Number 1=ADUM1200ARZ-RL7, Turn-On Delay Time=150ns, Type="General Purpose"
X1: library part X322540MPB4SI, "40MHz SMD Crystal Resonator 15pF SMD3225-4P Crystals ROHS", LCSC Part Number=C9010, Manufacturer="Yangxing Tech", ComponentLink1Description=LCSC, ComponentLink1URL=https://www.lcsc.com/product-detail/Crystals_Yangxing-Tech-X322540MPB4SI_C9010.html, Item Type=Crystal, Manufacturer Part Number=X322540MPB4SI
X2: library part TAXM3.579M2ILFBET2T, "3.579545MHz 20pF ±30ppm HC-49S-SMD Crystals ROHS", LCSC Part Number=C362352, Manufacturer=TAE, Package=HC-49S-SMD, ComponentLink1Description=LCSC, ComponentLink1URL=https://www.lcsc.com/product-detail/Crystals_TAE-Zhejiang-Abel-Elec-TAXM3-579M2ILFBET2T_C362352.html, Item Type=Crystal, Manufacturer Part Number=TAXM3.579M2ILFBET2T

## Free pads (board coordinates)
  round 0 hole 200.79 unplated: MH(0,0) MH(0.75,3582.03) MH(4133.98,0) MH(4133.98,3582.67)
  round 0 hole 118.11 unplated: MH(0.75,3264.01) MH(314.97,103.41) MH(1802.4,1201.57) MH(3501,1658) MH(3819,103.41)

## Via types
v1: diameter 23.62, hole 11.81, Top Layer to Bottom Layer, 449 vias

## Nets (pads, with @x,y where several pads share a name; then routed paths per layer and width w, separated by ;. In a path a pad name is that pad's centre, name@x,y a point inside that pad or via, vN(x,y) a via of type N, cw(c..) or ccw(c..) an arc to the next point about the centre after c; other vN are vias at no path point)
3V3: C9.2 C12.1 C17.2 C18.2 C19.2 C20.2 C21.2 C22.2 C24.2 C25.2 C35.1 C37.1 C38.1 C40.1 C41.1 C54.2 D4.1 J12.2 J17.1 J20.6 J20.24 J20.52 J21.6 J21.24 J21.52 L2.1 P5.1 R15.2 R16.2 R18.2 R19.2 R22.5 R22.6 R22.7 R22.8 R23.5 R23.6 R23.7 R23.8 R24.5 R24.6 R24.7 R24.8 R34.2 R47.2 R54.2 R55.2 R68.2 R69.2 R70.2 R71.2 R77.1 R94.2 R95.2 R96.2 U3.2 U3.4 U6.20 U6.46 U6.55 U6.56 U7.8 U11.9 U27.9 U27.15 U28.9 U28.16 U30.16 U31.8 U32.1 U32.8 U33.1 U33.8 | length 7535.1
  Top Layer w5: J17.1@1825.83,2466.15 J17.1@1826,2466.33 ; C24.2@2873.14,2748.38 C24.2@2876.32,2751.56 ; v1(3297.48,3063.04) 3297.48,3073.78 C54.2@3298.85,3075.15 ; U6.20@3298.57,3034.4 U6.20@3298.85,3034.13
  Top Layer w7: C17.2@3206.98,2726.77 C17.2@3205.92,2727.83 3205.92,2731.33 3220.11,2745.51 U6.46@3220.11,2764.44 ; v1(3297.48,3063.04) 3298.16,3062.35 3298.16,3034.81 U6.20@3298.57,3034.4
  Top Layer w10: J20.6@2406.18,1502.78 J20.6@2406.56,1502.4 ; J20.24@2406.37,1093.14 J20.24@2406.56,1092.95 ; v1(3206.98,2699.53) C17.2@3206.98,2726.77 ; v1@3376.59,2738.21 U6.56@3376.59,2764.44 ; R94.2@3491.74,2900.79 3491.74,2898.82 3492.05,2898.5 v1@3506.29,2898.5 ; v1(3506.29,2899.41) v1@3506.29,2898.5 ; v1@3511.42,2898.5 v1@3506.29,2898.5
  Top Layer w15: J12.2@916.57,2477.39 916.79,2477.6 916.79,2513.53 v1(917,2513.75) ; v1@2362,1093.14 J20.24@2406.37,1093.14 ; v1@2362,1502.78 J20.6@2406.18,1502.78
  Top Layer w20: P5.1@-113.27,1586.51 v1(-45,1586.51) ; v1(2328,2969) 2328,2920 ; v1(2349,2496.33) 2251.67,2496.33 2220.98,2527.02 2220.98,2900.27 2240.7,2920 2328,2920 ; v1(2769,2892) 2769,2835 ; C25.2@2878.84,2801.85 2878.84,2818.41 2862.25,2835 2769,2835 ; v1(2878.97,2669.36) 2878.82,2669.51 2878.82,2747.1 2902.37,2770.65 ; 2328,2920 2342.6,2905.4 J21.6@2406.56,2905.4 2517.74,2905.4 2617.14,2806 2740,2806 2769,2835
  Power + Signal w20: v1(3206.98,2699.53) 3363.61,2699.53 3376.96,2712.88 v1(3376.96,2736.58)
  Power + Signal w30: v1(-45,1586.51) 15.51,1526 510.14,1526 644.14,1660 1044.45,1660 v1(1087.44,1617.01)
  Bottom Layer w5: R68.2@2934.14,2434.25 3009.77,2434.25 3028.27,2452.75
  Bottom Layer w7: v1@3376.26,2736.58 v1(3376.96,2736.58)
  Bottom Layer w10: 2298.43,2506 2299,2505.43 ; U30.16@2311.52,2937.72 2322.17,2937.72 U30.16@2328,2943.54 ; 2563.05,965.98 2564,965.03 ; 2575.64,546.35 2577.39,548.09 ; 2577.39,550.09 R47.2@2635.39,550.09 ; R71.2@2784.14,2434.25 R69.2@2832.14,2434.25 R70.2@2884.14,2434.25 R68.2@2934.14,2434.25 ; v1(2878.97,2669.36) 2879.38,2669.78 2934.14,2669.78 U31.8@2934.14,2743.02 ; R22.8@3149.16,665.5 R22.8@3154.09,665.5 ; 3191.16,2736.33 R16.2@3204.42,2736.33 3206.98,2736.33 3210.98,2740.33 3219.73,2740.33 3232.77,2753.38 3235.46,2753.38 R96.2@3235.58,2753.5 ; R16.2@3206.98,2733.77 R16.2@3206.98,2735.39
  Bottom Layer w15: C41.1@2242.92,2937.72 U30.16@2311.52,2937.72 ; U30.16@2328,2943.54 v1(2328,2969) ; v1(2769,2892) R77.1@2794.39,2892.06 ; 2958.91,2745.09 2961.8,2742.21 2965.43,2742.21 ; U11.9@2991.08,599.78 3037.61,599.78 3042.9,605.07 C35.1@3046.4,605.07 3143.76,605.07 3146.73,608.05 ; U27.9@2991.39,1092.98 3044.7,1092.98 3051.7,1099.98 C37.1@3055.2,1099.98 3153.73,1099.98 3155,1101.25 ; U28.9@2991.39,1596.64 3034.03,1596.64 3039.47,1602.07 C38.1@3042.97,1602.07 3139.2,1602.07 3144.64,1596.64 3155,1596.64 ; v1(3297.48,3063.04) 3298.18,3062.33 3459.08,3062.33 ; C19.2@3376.96,2714.38 v1(3376.96,2736.58) ; D4.1@3499.34,2973.16 D4.1@3506.29,2980.11 ; v1(3506.29,2899.41) 3512.59,2899.41 3514.42,2901.23 3514.42,2875.11 C21.2@3509.76,2870.46
  Bottom Layer w16: 2540.73,1494.28 R55.2@2673.11,1494.28 ; R55.2@2674.23,1494.28 U28.16@2723.67,1494.28
  Bottom Layer w17: 2564,965.03 U27.15@2723.68,965.03
  Bottom Layer w20: 2958.91,2745.09 2958.91,3221.76 2976.16,3239 3445.16,3239 3459.08,3225.07 3459.08,3062.33 3506.29,3015.13 D4.1@3506.29,2980.11 ; v1(3206.98,2699.53) R16.2@3206.98,2733.77
  Bottom Layer w23: 3397.25,2726.61 3496.37,2726.61 3514.76,2745 L2.1@3514.76,2827.34 3514.76,2843.09
  Bottom Layer w30: v1(917,2513.75) 889.02,2485.76 889.02,2279.67 1079.02,2089.67 U3.4@1088.44,2089.67 ; v1(1826,2416.45) 2142.16,2416.45 2231.71,2506 2298.43,2506
  other v1: 2362,652 2362,1093.33 2362,1503.15 970.33,1970.93 1049.07,1970.93 1127.81,1970.93 1206.55,1970.93 970.33,2049.67 1049.07,2049.67 1127.81,2049.67 1206.55,2049.67 2349,2055 970.33,2128.41 1049.07,2128.41 1127.81,2128.41 1206.55,2128.41 970.33,2207.15 1049.07,2207.15 1127.81,2207.15 1206.55,2207.15
5V: 2.5 C11.1 C13.2 C15.1 C16.2 C32.2 C36.1 J12.1 J20.46 J20.48 J21.46 J21.48 K2.5 K3.5 P4.1 R7.1 R10.2 U2.2 U2.7 U3.3 U4.2 U8.11 U8.20 U20.9 | length 8285.9
  Top Layer w10: 589.49,1368.51 593,1365 ; v1(807.96,2513.53) 877.48,2513.53 896.89,2494.12 J12.1@896.89,2388.8 896.89,2311.83 911.08,2297.64 1669.16,2297.64 1817.79,2149.01 1817.79,1938.31 1806.38,1926.9 1784.4,1926.9 C32.2@1784.21,1926.9
  Top Layer w15: U8.20@1784.21,1875.72 1732.59,1875.72 1709.21,1852.34 1709.21,1668.2 1732.01,1645.4 U8.11@1824.37,1645.4 ; U8.20@1784.4,1875.72 C32.2@1784.4,1926.9
  Top Layer w20: P4.1@-113.27,1368.51 v1(-45,1368.51)
  Top Layer w40: v1(-45,1368.51) 309.75,1368.51 346.12,1332.14 346.12,1331.51
  Bottom Layer w10: -3.89,2452.21 R10.2@-3.89,2517.33 ; U2.2@474.31,1145.96 U2.7@474.31,1204.23 R7.1@474.31,1231.09 474.31,1283.17 v1(475.15,1284)
  Bottom Layer w25: 2.5@715.47,3181.09 783.26,3113.31 783.26,2980.18 864,2899.44 864,2569.57 ; K2.5@1313.21,3181.09 1381,3113.31 1381,2983.29 1489.97,2874.33 1489.97,2641.43
  Bottom Layer w40: v1(-45,1368.51) -96.45,1368.51 -136,1408.07 -136,1800 -88,1848 -88,2418.47 -54.26,2452.21 -3.89,2452.21 262.51,2452.21 ; 326.83,2567.76 262.51,2567.76 262.51,2452.21 ; K3.5@1909.21,3181.09 2020.11,3181.09 2094.61,3106.59 2094.61,2639.33 2000.07,2544.79 1750.82,2544.79 1654.18,2641.43 1489.97,2641.43 1418.11,2569.57 864,2569.57 v1(807.96,2513.53) 746.63,2452.21 262.51,2452.21
  other v1: 1882,715 1926,715 2249.49,715 2362,715 1882,742.56 1926,742.56 2249.49,742.56 2362,746.1 505.75,1284 474.31,1314.57 505.75,1314.57 603.44,1475 635,1475 603.44,1511.5 635,1511.5 2480.64,2118 2480.64,2149.1
5V_BUCK: C2.2 C7.1 C8.1 L1.2 P2.1 R5.2 R6.2 U2.3 U2.5 | length 1841.7
  Top Layer w20: P2.1@-113.27,1913.51 143.82,1913.51 195.75,1861.57 666.31,1861.57 704.06,1823.83 704.06,1134.58 735.51,1103.13 799.82,1103.13
  Bottom Layer w10: U2.5@434.94,1204.23 U2.5@435.25,1203.92 ; 443.83,1175.09 451.63,1175.09 453.63,1173.09 ; R6.2@443.94,1107.59 443.94,1106.75 444.26,1106.44 454.63,1106.44 464.47,1096.59 C2.2@487.65,1096.59 ; R5.2@1151.4,1020.4 1151.4,1089
  Bottom Layer w12: 454.63,1115.44 454.63,1176.24
  other v1: 524,1086 558,1086 1040.9,1086 1074.9,1086 524,1120 558,1120 1040.9,1120 1074.9,1120
5V_USB: FB1.2 P3.1 U2.6 | length 1246.9
  Top Layer w20: P3.1@-113.27,1695.51 v1(-20,1695.51) v1@-18.19,1695.51
  Bottom Layer w10: 379,1252.38 428.77,1252.38 ; 454.63,1237.2 U2.6@454.63,1204.23 U2.6@454.77,1204.09
  Bottom Layer w15: v1(-20,1695.51) 114.49,1695.51 131,1679 131,1301.71 147.71,1285 289.18,1285 320.5,1253.68 320.5,974.59 352.5,942.59
9V: LED3.1 P8.1 R87.2 | length 639
  Top Layer w15: LED3.1@-75.52,2270.57 -71.52,2274.57 v1(116.4,2274.57)
  Top Layer w20: P8.1@-113.27,2131.51 -7.03,2131.51 3.99,2120.49 3.99,2097.84 v1(4.69,2097.15)
  Bottom Layer w20: v1(4.69,2097.15) 4.69,2253 26.26,2274.57 v1(116.4,2274.57) R87.2@139.9,2274.57
13PIN_TERMINAL.INPUT_1: J4.1 R35.1 | length 246
  Bottom Layer w20: J4.1@1121.96,102.58 1121.96,181.13 1157.38,216.56 R35.1@1274.72,216.56
13PIN_TERMINAL.INPUT_2: J4.2 R37.1 | length 114.1
  Bottom Layer w20: R37.1@1321.72,216.56 1321.84,216.44 1321.84,102.69 J4.2@1321.96,102.58
13PIN_TERMINAL.INPUT_3: J4.3 R39.1 | length 250.9
  Bottom Layer w20: R39.1@1367.72,216.56 1492.42,216.56 1521.96,187.02 J4.3@1521.96,102.58
13PIN_TERMINAL.INPUT_4: J6.1 R41.1 | length 253.3
  Bottom Layer w20: J6.1@1721.96,102.58 1721.96,191.13 1747.38,216.56 R41.1@1876.14,216.56
13PIN_TERMINAL.INPUT_5: J6.2 R43.1 | length 114.1
  Bottom Layer w20: J6.2@1921.96,102.58 1922.05,102.67 1922.05,216.46 R43.1@1922.14,216.56
13PIN_TERMINAL.INPUT_6: J6.3 R45.1 | length 253
  Bottom Layer w20: R45.1@1968.55,216.56 2097.42,216.56 2121.96,192.02 J6.3@2121.96,102.58
13PIN_TERMINAL.INPUT_7: J8.1 R36.1 | length 250
  Bottom Layer w20: J8.1@2321.96,102.58 2321.96,191.13 2348.42,217.59 R36.1@2472.47,217.59
13PIN_TERMINAL.INPUT_8: J8.2 R38.1 | length 114